# Altium PCB ESC_v0.PcbDoc (part 2 of 2)
Units mm, origin at the board's own origin, x right, y up, seen from the top; angles counter-clockwise.
Board outline 41.25 x 47.75 mm, 4 copper layers (Top Layer, Mid Layer 1, Mid Layer 2, Bottom Layer), stack 1.65 mm thick; 224 components, 141 nets, 1063 pads, 210 vias.
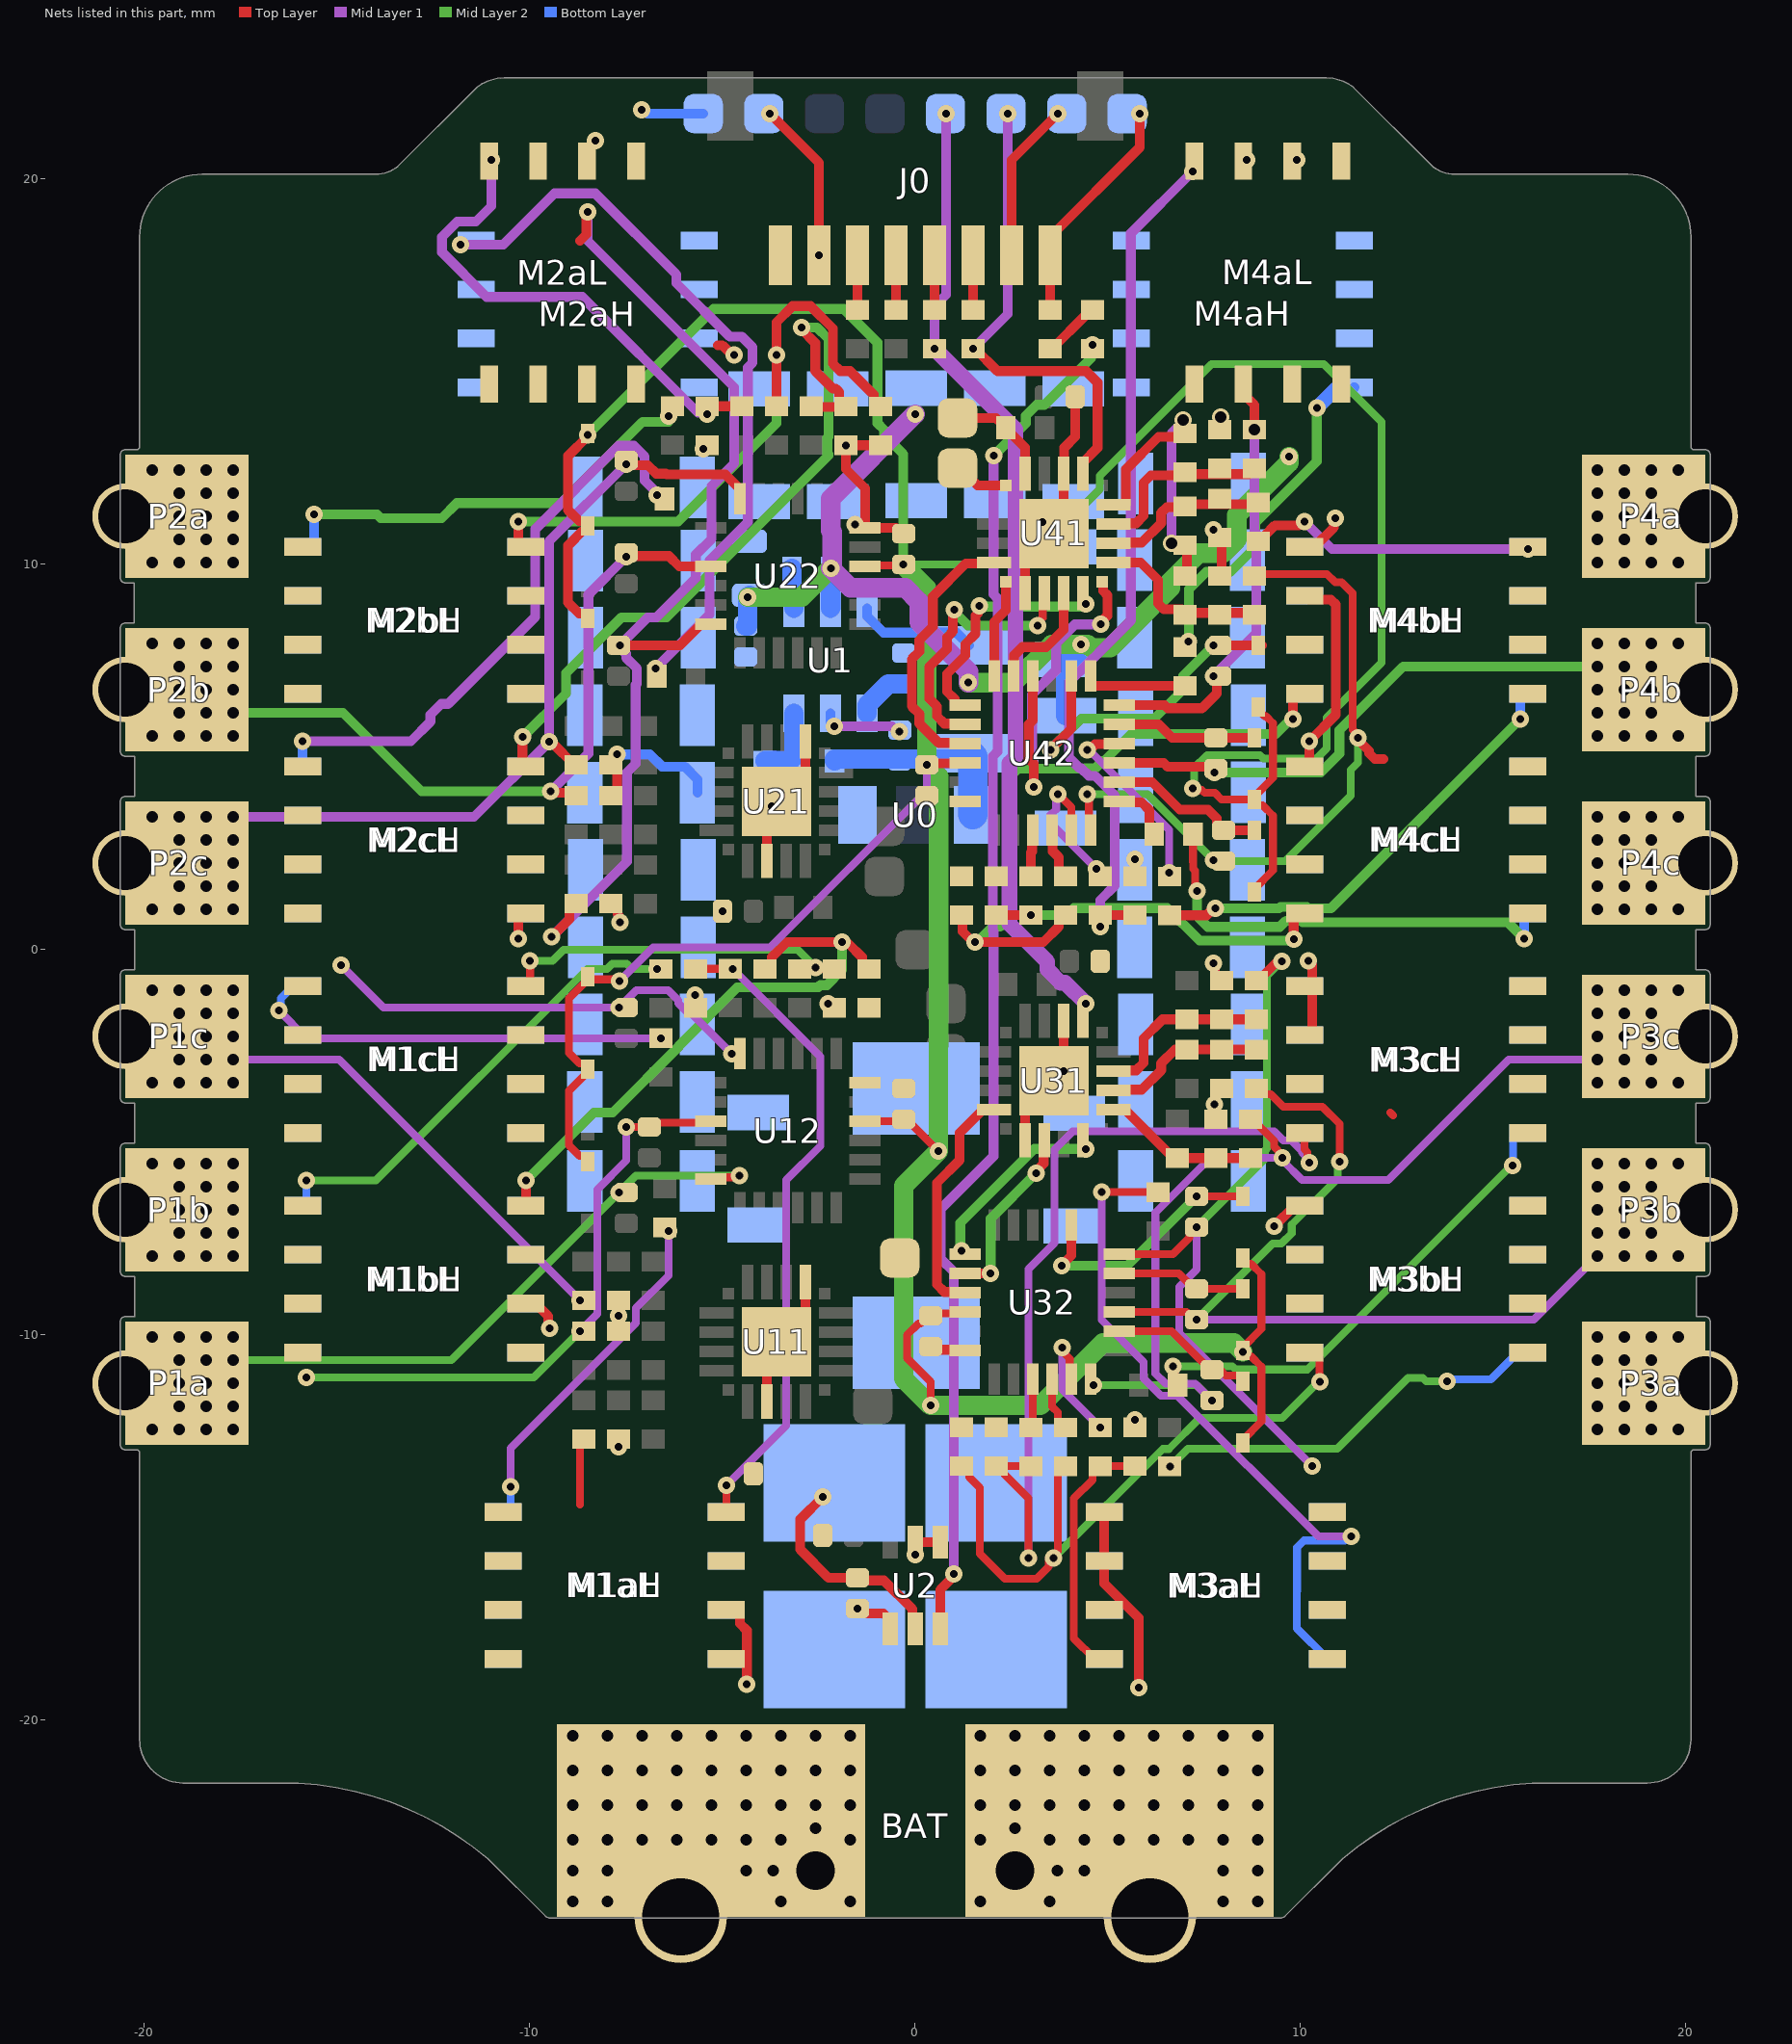
[diagram p4: the nets of this part, all layers, seen from the top]

## Via types
v1: diameter 0.45, hole 0.2, Top Layer to Bottom Layer, 202 vias
v2: diameter 0.45, hole 0.3, Top Layer to Bottom Layer, 4 vias
v3: diameter 4.572, hole 3.975, Top Layer to Bottom Layer, 4 vias

## Nets (pads, with @x,y where several pads share a name; then routed paths per layer and width w, separated by ;. In a path a pad name is that pad's centre, name@x,y a point inside that pad or via, vN(x,y) a via of type N, cw(c..) or ccw(c..) an arc to the next point about the centre after c; other vN are vias at no path point) (continued)
ch3_in: CH3.P$1 R3.P$1 U31.2 | length 25.6
  Top Layer w0.254: U31.2@4.35,-1.85 4.375,-1.825 4.375,-1.506 4.431,-1.451 v1(4.431,-1.398)
  Mid Layer 1 w0.254: v1(0.5,15.6) 0.5,16.7 0.8,17 v1(0.8,21.7) ; 3.445,-0.498 3.445,-0.488 ; 3.802,-0.855 3.812,-0.855
  Mid Layer 1 w0.406: v1(0.5,15.6) 2.6,13.5 2.6,4.996 2.445,4.841 2.445,0.67 3.429,-0.314 3.429,-0.514 3.77,-0.855 3.888,-0.855 v1(4.431,-1.398)
ch3_lin1: U31.15 U32.1 | length 5.1
  Top Layer w0.254: U31.15@4.35,-4.95 4.35,-5.089 v1(4.431,-5.17)
  Mid Layer 2 w0.254: v1(1.206,-7.819) 1.171,-7.785 1.171,-7.086 3.088,-5.17 v1(4.431,-5.17)
ch3_lin2: U31.13 U32.2 | length 4.7
  Top Layer w0.254: U32.2@1.3,-8.4 v1(1.956,-8.4) ; v1(3.133,-5.802) 3.133,-5.749 3.333,-5.549 3.333,-4.967 U31.13@3.35,-4.95
  Mid Layer 2 w0.254: v1(1.956,-8.4) 1.956,-6.979 v1(3.133,-5.802)
ch3_lin3: U31.10 U32.3 | length 6.1
  Top Layer w0.254: U32.3@1.3,-8.9 1.283,-8.883 0.757,-8.883 0.563,-8.689 0.563,-6.05 1.155,-5.458 1.155,-4.753 1.733,-4.175 2.025,-4.175 U31.10@2.05,-4.15
ch3_lo1: R64.P$1 U32.11 | length 3.4
  Top Layer w0.203: v1(3.813,-10.33) 3.86,-10.377 3.86,-10.47 4.007,-10.617 4.007,-11.107 U32.11@4.05,-11.15
  Mid Layer 1 w0.203: v1(3.813,-10.33) 3.813,-11.413 v1(4.8,-12.4)
ch3_lo2: R66.P$1 U32.10 | length 1.4
  Top Layer w0.203: U32.10@3.55,-11.15 3.55,-11.861 3.697,-12.008 3.697,-12.248 3.849,-12.4 R66.P$1@3.9,-12.4
ch3_lo3: R68.P$1 U32.9 | length 1.3
  Top Layer w0.203: R68.P$1@3,-12.4 3.05,-12.35 U32.9@3.05,-11.15
ch3_mux1: R70.P$2 R71.P$2 R72.P$2 U31.19 | length 4.6
  Top Layer w0.254: U31.19@5.15,-3.15 5.167,-3.133 5.731,-3.133 5.925,-2.939 5.925,-2.3 6.417,-1.808 R71.P$2@7.05,-1.808 R72.P$2@7.95,-1.808 R70.P$2@8.85,-1.808
ch3_mux2: R73.P$2 R74.P$2 R75.P$2 U31.18 | length 4.2
  Top Layer w0.254: U31.18@5.15,-3.65 5.167,-3.633 5.878,-3.633 6.382,-3.129 6.382,-2.949 6.739,-2.592 R74.P$2@7.05,-2.592 R75.P$2@7.95,-2.592 R73.P$2@8.85,-2.592
ch3_mux3: R76.P$2 R77.P$2 R78.P$2 U31.17 | length 4.2
  Top Layer w0.254: U31.17@5.15,-4.15 5.442,-4.15 6.7,-5.408 7.05,-5.408 7.95,-5.408 R76.P$2@8.85,-5.408
ch3_vb1: C33.P$1 D33.K U32.20 | length 6.6
  Top Layer w0.203: v1(7.3,-6.4) D33.K@8.5,-6.4
  Top Layer w0.254: v1(3.8,-8.2) 3.8,-8.187 4.05,-7.937 U32.20@4.05,-7.15
  Mid Layer 2 w0.254: v1(3.8,-8.2) 5.5,-8.2 v1(7.3,-6.4)
ch3_vb2: C34.P$1 D34.K U32.17 | length 3.4
  Top Layer w0.203: U32.17@5.3,-8.4 6.835,-8.4 7.235,-8.8 D34.K@8.5,-8.8
ch3_vb3: C35.P$1 D35.K U32.14 | length 3.6
  Top Layer w0.203: U32.14@5.3,-9.9 6.649,-9.9 7.649,-10.9 C35.P$1@7.7,-10.9 ; C35.P$1@7.91,-10.9 8.057,-11.047 8.424,-11.047 8.5,-11.124 D35.K@8.5,-11.2
ch4_c2ck: CK4.P$1 R80.P$1 U41.5 | length 2.8
  Top Layer w0.254: CK4.P$1@1.1,13.8 2.1,13.8 2.172,13.728 2.223,13.728 2.35,13.601 R80.P$1@2.35,13.55 2.35,13.499 2.477,13.372 2.51,13.372 2.85,13.032 U41.5@2.85,12.35
ch4_c2d: CD4.P$1 U41.6 | length 1.4
  Top Layer w0.254: CD4.P$1@1.1,12.5 1.169,12.5 1.619,12.05 U41.6@2.35,12.05
ch4_com_all: R91.P$1 R94.P$1 R97.P$1 U41.20 | length 7.5
  Top Layer w0.254: U41.20@5.15,11.55 5.442,11.55 5.467,11.575 5.467,12.467 6.313,13.313 6.813,13.313 R91.P$1@6.85,13.35 ; v2(6.95,13.75) 6.975,13.725 6.975,13.425 R91.P$1@7,13.4 ; R97.P$1@7.05,9.75 R94.P$1@7.05,10.55
  Mid Layer 1 w0.254: v2(6.648,10.552) 6.648,13.395 6.95,13.697 v2(6.95,13.75)
ch4_hin1: U41.16 U42.22 | length 9.6
  Top Layer w0.254: U42.22@3.05,7.1 3.05,5.951 2.945,5.845 2.945,4.954 3.072,4.827 3.072,4.227 v1(3.078,4.221) ; v1(4.814,8.443) 4.814,8.496 4.986,8.667 4.986,9.201 4.875,9.312 4.875,9.525 U41.16@4.85,9.55
  Mid Layer 1 w0.254: v1(3.078,4.221) 3.078,4.917 3.041,4.954 3.041,4.98 3.032,4.989 3.032,6.626 3.658,7.252 3.658,7.959 4.142,8.443 v1(4.814,8.443)
ch4_hin2: U41.14 U42.23 | length 3.1
  Top Layer w0.254: U42.23@2.55,7.1 2.567,7.117 2.567,7.643 2.781,7.857 3.402,7.857 3.85,8.305 U41.14@3.85,9.25 U41.14@3.833,9.233
ch4_hin3: U41.11 U42.24 | length 2.6
  Top Layer w0.254: U42.24@2.05,7.1 2.05,8.512 2.35,8.812 U41.11@2.35,9.55
ch4_ho1: R81.P$1 U42.19 | length 2.7
  Top Layer w0.254: U42.19@4.55,7.1 4.55,6.875 4.575,6.85 R81.P$1@7,6.85
ch4_ho2: R82.P$1 U42.16 | length 5.1
  Top Layer w0.203: v1(6.585,2) 6.585,1.915 R82.P$1@6.6,1.9
  Top Layer w0.254: v1(4.469,5.188) 4.522,5.188 4.667,5.333 5.283,5.333 U42.16@5.3,5.35
  Mid Layer 1 w0.203: v1(4.469,5.188) 4.508,5.188 6.585,3.11 v1(6.585,2)
ch4_ho3: R83.P$1 U42.13 | length 1.5
  Top Layer w0.254: U42.13@5.3,3.85 5.325,3.825 5.875,3.825 6.073,3.627 6.073,3.127 R83.P$1@6.2,3
ch4_in: CH4.P$1 R4.P$1 U41.2 | length 12.6
  Top Layer w0.254: v1(1.5,15.6) 1.551,15.6 2.135,15.016 4.436,15.016 4.734,14.717 4.734,13.026 4.35,12.642 U41.2@4.35,12.35
  Mid Layer 1 w0.254: v1(1.5,15.6) 2.4,16.5 v1(2.4,21.7)
ch4_lin1: U41.15 U42.1 | length 6.4
  Top Layer w0.254: U42.1@1.3,6.35 1.046,6.35 1.021,6.375 1.021,6.504 0.824,6.701 0.824,7.161 1.3,7.636 1.3,7.937 1.566,8.203 1.566,8.675 1.622,8.73 1.622,8.886 v1(1.657,8.921) ; U41.15@4.35,9.25 4.35,9.052 v1(4.431,8.971)
  Mid Layer 2 w0.254: v1(1.657,8.921) 1.672,8.906 4.313,8.906 4.378,8.971 v1(4.431,8.971)
ch4_lin2: U41.13 U42.2 | length 7.2
  Top Layer w0.203: v1(3.172,8.412) 3.172,8.479 3.307,8.614 3.307,9.207 U41.13@3.35,9.25
  Top Layer w0.254: v1(1.011,8.828) 0.973,8.791 0.973,8.257 0.824,8.108 0.824,7.807 0.367,7.35 0.367,6.511 0.563,6.315 0.563,6.061 0.757,5.867 1.283,5.867 U42.2@1.3,5.85
  Mid Layer 2 w0.254: v1(1.011,8.828) 1.011,8.775 1.365,8.421 1.365,8.412 v1(3.172,8.412)
ch4_lin3: U41.10 U42.3 | length 7
  Top Layer w0.254: U42.3@1.3,5.35 1.283,5.367 0.61,5.367 0.106,5.871 0.106,6.126 -0.09,6.322 -0.09,7.539 0.106,7.736 0.106,8.037 0.456,8.386 0.456,9.169 1.311,10.025 2.025,10.025 U41.10@2.05,10.05
ch4_lo1: R84.P$1 U42.11 | length 3.8
  Top Layer w0.203: v1(3.704,4.035) 3.717,4.035 4.05,3.703 U42.11@4.05,3.1 ; v1(4.7,2.1) 4.7,2.008 R84.P$1@4.8,1.908
  Mid Layer 1 w0.203: v1(3.704,4.035) 3.657,3.988 3.657,3.643 3.509,3.495 3.509,3.291 v1(4.7,2.1)
ch4_lo2: R86.P$1 U42.10 | length 1.4
  Top Layer w0.254: U42.10@3.55,3.1 3.567,3.083 3.567,2.557 3.722,2.402 3.722,2.035 3.849,1.908 R86.P$1@3.9,1.908
ch4_lo3: R88.P$1 U42.9 | length 1.2
  Top Layer w0.254: R88.P$1@3,1.908 3,2.524 3.033,2.557 3.033,3.083 U42.9@3.05,3.1
ch4_mux1: R90.P$2 R91.P$2 R92.P$2 U41.19 | length 4.5
  Top Layer w0.254: U41.19@5.15,11.05 5.167,11.067 5.731,11.067 5.925,11.261 5.925,11.671 5.925,12.125 6.113,12.313 6.821,12.313 6.85,12.342 7.75,12.342 R90.P$2@8.65,12.342
ch4_mux2: R93.P$2 R94.P$2 R95.P$2 U41.18 | length 4.3
  Top Layer w0.254: U41.18@5.15,10.55 5.167,10.567 5.878,10.567 6.382,11.071 6.382,11.339 6.531,11.488 6.98,11.488 7.05,11.558 7.95,11.558 R93.P$2@8.85,11.558
ch4_mux3: R96.P$2 R97.P$2 R98.P$2 U41.17 | length 4.6
  Top Layer w0.254: U41.17@5.15,10.05 5.85,10.05 6.3,9.6 6.3,8.984 6.449,8.835 6.906,8.835 6.999,8.742 7.95,8.742 R96.P$2@8.85,8.742
ch4_vb1: C43.P$1 D43.K U42.20 | length 9
  Top Layer w0.254: v1(3.511,5.188) 3.511,5.199 4.05,5.738 U42.20@4.05,7.1 ; v1(7.738,7.9) 8.389,7.9 D43.K@9,7.9
  Mid Layer 2 w0.254: v1(3.511,5.188) 3.511,5.199 4.312,6 6.2,6 6.95,6.75 6.95,7.113 v1(7.738,7.9)
ch4_vb2: C44.P$1 D44.K U42.17 | length 3.6
  Top Layer w0.254: U42.17@5.3,5.85 6.322,5.85 6.672,5.5 D44.K@8.8,5.5
ch4_vb3: C45.P$1 D45.K U42.14 | length 4.1
  Top Layer w0.254: U42.14@5.3,4.35 6.15,4.35 6.865,3.635 7.599,3.635 7.822,3.412 7.822,3.227 7.949,3.1 C45.P$1@8,3.1 D45.K@8.8,3.1
curr_sens: CURR.P$1 J0.1 R04.P$2 | length 6.1
  Top Layer w0.254: R04.P$2@3.5,16.608 J0.1@3.5,18.025 3.5,18.5 5.828,20.828 v1(5.828,21.7)
GND: BAT.P$2 C01.P$2 C1.P$2 C02.P$2 C2.P$2 C03.P$2 C3.P$2 C4.P$2 C04.P$2 C5.P$2 C6.P$2 C7.P$2 C8.P$1 C9.P$1 C10.P$1 C11.P$2 C12.P$2 C16.P$2 C17.P$2 C18.P$2 C19.P$2 C21.P$2 C22.P$2 C26.P$1 C27.P$1 C28.P$1 C29.P$1 C30.P$1 C31.P$2 C32.P$2 C36.P$1 C37.P$1 C38.P$1 C39.P$1 C40.P$1 C41.P$2 C42.P$2 C46.P$1 C47.P$1 C48.P$2 C50.P$1 C60.P$1 D00.C gnd.P$1 GNDd.P$1 J0.8 M1aL.1 M1aL.2 M1aL.3 M1bL.1 M1bL.2 M1bL.3 M1cL.1 M1cL.2 M1cL.3 M2aL.1 M2aL.2 M2aL.3 M2bL.1 M2bL.2 M2bL.3 M2cL.1 M2cL.2 M2cL.3 M3aL.1 M3aL.2 M3aL.3 M3bL.1 M3bL.2 M3bL.3 M3cL.1 M3cL.2 M3cL.3 M4aL.1 M4aL.2 M4aL.3 M4bL.1 M4bL.2 M4bL.3 M4cL.1 M4cL.2 M4cL.3 R01.P$1 R25.P$2 R27.P$2 R29.P$2 R32.P$1 R35.P$1 R38.P$1 R45.P$2 R47.P$2 R49.P$2 R52.P$1 R55.P$1 R58.P$1 R65.P$2 R67.P$2 R69.P$2 R72.P$1 R75.P$1 R78.P$1 R85.P$2 R87.P$2 R89.P$2 R92.P$1 R95.P$1 R98.P$1 U0.1 U1.2 U2.1 U2.2 U11.3 U11.12 U11.21 U12.6 U21.3 U21.12 U21.21 U22.6 U31.3 U31.12 U31.21 U32.6 U41.3 U41.12 U41.21 U42.6 | length 57.3
  Top Layer w0.254: v1@-10.4,0.3 -10.312,0.3 v1(-10.3,0.288) -10.3,0.843 -10.199,0.945 M2cL.1@-10.104,0.945 ; M1bL.2@-10.104,-9.185 -9.85,-9.185 -9.524,-9.511 -9.524,-9.782 v1(-9.487,-9.82) ; M2aL.2@-8.515,20.471 -8.515,20.725 -8.338,20.902 -8.338,20.962 v1(-8.3,21) ; R52.P$1@-7.9,1.2 -7.849,1.2 -7.722,1.073 -7.722,0.922 -7.702,0.902 -7.702,0.743 v1(-7.665,0.706) ; R55.P$1@-7.9,4 -7.86,4 -7.733,4.127 v1(-7.733,5.07) -7.77,5.032 -7.77,4.927 -7.897,4.8 R58.P$1@-7.9,4.8 ; v1(-7.7,-12.9) R32.P$1@-7.7,-12.7 ; R35.P$1@-7.7,-9.9 v1(-7.7,-9.5) R38.P$1@-7.7,-9.1 ; v1(-5.712,-1.182) -5.706,-1.188 -5.706,-1.502 R25.P$2@-5.7,-1.508 ; v1(-5.5,13) -5.492,13 R45.P$2@-5.4,13.092 ; -5.119,15.69 -5.007,15.69 -4.753,15.435 v1(-4.7,15.435) ; M1aL.2@-4.904,-17.135 -4.65,-17.135 -4.549,-17.237 -4.549,-17.491 -4.368,-17.671 v1(-4.368,-19.058) ; U11.3@-3.85,-11.726 -3.85,-10.426 U11.21@-3.6,-10.176 -2.85,-9.426 U11.12@-2.85,-8.626 ; U21.3@-3.85,2.3 -3.85,3.6 v1(-3.725,3.725) U21.21@-3.6,3.85 -2.85,4.6 U21.12@-2.85,5.4 ; v1(-2.267,-1.4) -2.208,-1.4 R29.P$2@-2.1,-1.508 ; v1(-1.56,11.031) -1.479,10.95 U22.6@-1.3,10.95 ; R47.P$2@-0.9,13.092 v1(-1.8,13.092) -1.8,12.476 -1.3,11.976 U22.6@-1.3,10.95 ; C22.P$2@-0.3,10.8 -0.351,10.8 -0.501,10.95 U22.6@-1.3,10.95 ; v1(0,-15.705) U2.2@0,-15.375 U2.1@0.65,-15.375 ; C32.P$2@0.4,-10.3 0.483,-10.383 1.283,-10.383 U32.6@1.3,-10.4 ; U31.12@2.85,-4.95 2.85,-4.15 U31.21@3.6,-3.4 v1(3.85,-3.15) U31.3@3.85,-1.85 ; U41.12@2.85,9.25 2.85,10.05 U41.21@3.6,10.8 ; v1(3.3,11.1) U41.21@3.6,10.8 ; C41.P$2@4.15,14.35 4.15,13.316 3.867,13.034 3.867,12.367 U41.3@3.85,12.35 3.85,11.05 U41.21@3.6,10.8 ; M3aL.1@4.904,-14.595 M3aL.2@4.904,-15.865 4.904,-16.449 5.8,-17.345 v1(5.8,-19.151) ; R65.P$2@5.7,-12.392 v1(5.7,-12.2) ; R85.P$2@5.7,1.908 v1(5.7,2.345) ; v1(7.738,-0.354) 7.775,-0.392 7.775,-0.673 7.902,-0.8 R72.P$1@7.95,-0.8 ; v1(7.738,10.9) 7.738,10.862 R95.P$1@7.9,10.7 ; R92.P$1@7.9,13.5 7.925,13.525 v2(7.925,13.825) ; R78.P$1@7.95,-4.4 7.925,-4.4 7.798,-4.273 7.798,-4.047 v1(7.761,-4.01) 7.798,-3.972 7.798,-3.727 7.925,-3.6 R75.P$1@7.95,-3.6 ; R98.P$1@7.95,9.75 R95.P$1@7.95,10.55 ; M4aL.3@8.515,20.471 8.571,20.471 v1(8.6,20.5) ; v1(9.315,-7.172) 9.323,-7.172 9.85,-6.645 M3bL.1@10.104,-6.645 ; M4aL.2@9.785,20.471 9.871,20.471 v1(9.9,20.5) ; M3cL.2@10.104,-2.215 10.199,-2.215 10.3,-2.113 10.3,-0.4 10.2,-0.3 v1(10.2,-0.288) ; M4cL.1@10.104,4.755 10.124,4.755 10.225,4.857 v1(10.225,5.412) 10.917,6.104 10.917,8.954 10.788,9.083 10.206,9.083 M4bL.2@10.104,9.185 ; M4bL.1@10.104,10.455 10.358,10.455 10.862,10.959 10.862,11.163 v1(10.9,11.201)
  Mid Layer 1 w0.254: v1(-2.1,5.8) -0.602,5.8 -0.459,5.657 v1(-0.406,5.657)
  Bottom Layer w0.254: v1(-7.733,5.07) -6.884,5.07 -6.567,4.752 -5.98,4.752 -5.65,4.421 C10.P$1@-5.65,4.079 ; v1(-7.1,21.8) -7.047,21.8 -6.947,21.7 GNDd.P$1@-5.5,21.7 ; U1.2@-2.2,6.135 -2.2,5.9 v1(-2.1,5.8)
  other v1: -5,1
M1a: C13.P$2 M1aH.1 M1aH.2 M1aH.3 M1aL.5 M1aL.6 M1aL.7 M1aL.8 P1a.P$1 R30.P$1 U12.18 | length 17.8
  Top Layer w0.203: -8.7,-14.4 -8.7,-12.8 R30.P$1@-8.6,-12.7 ; v1(-7.688,-6.3) C13.P$2@-7.5,-6.3 ; U12.18@-5.3,-5.95 -5.258,-5.908 -4.598,-5.908 v1(-4.556,-5.865)
  Mid Layer 2 w0.203: P1a.P$1@-17.7,-10.65 -12.038,-10.65 v1(-7.688,-6.3) -7.253,-5.865 v1(-4.556,-5.865)
M1a_HG: M1aH.4 R21.P$2 | length 9.3
  Top Layer w0.203: R21.P$2@-6.5,-7.208 -6.408,-7.3 v1(-6.4,-7.3)
  Mid Layer 1 w0.203: v1(-10.5,-13.938) -10.5,-12.941 -7.246,-9.688 -7.246,-9.305 -6.4,-8.459 v1(-6.4,-7.3)
  Bottom Layer w0.203: M1aH.4@-10.696,-14.595 -10.627,-14.595 -10.5,-14.468 v1(-10.5,-13.938)
M1a_LG: M1aL.4 R24.P$2 R25.P$1 | length 17
  Top Layer w0.203: R25.P$1@-5.7,-0.5 -5.696,-0.496 -4.804,-0.496 R24.P$2@-4.8,-0.492 -4.792,-0.5 -4.788,-0.496 v1(-4.741,-0.496) ; M1aL.4@-4.904,-14.595 -4.9,-14.591 v1(-4.9,-13.9)
  Mid Layer 1 w0.203: v1(-4.9,-13.9) -3.346,-12.346 -3.346,-5.977 -2.463,-5.094 -2.463,-2.774 v1(-4.741,-0.496)
M1b: C14.P$2 M1bH.1 M1bH.2 M1bH.3 M1bL.5 M1bL.6 M1bL.7 M1bL.8 P1b.P$1 R33.P$1 U12.15 | length 15.7
  Top Layer w0.203: v1(-7.5,-4.6) C14.P$2@-6.9,-4.6 -6.793,-4.493 -5.343,-4.493 U12.15@-5.3,-4.45
  Mid Layer 1 w0.203: v1(-8.7,-9.9) -8.246,-9.446 -8.246,-7.76 -8.254,-7.752 -8.254,-6.224 -7.5,-5.471 v1(-7.5,-4.6)
  Mid Layer 2 w0.203: v1(-15.8,-11.104) -9.904,-11.104 v1(-8.7,-9.9)
M1b_HG: M1bH.4 R22.P$2 | length 12.3
  Top Layer w0.203: v1(-6.7,-0.5) R22.P$2@-6.6,-0.5
  Mid Layer 2 w0.203: v1(-15.8,-5.988) -13.994,-5.988 -8.506,-0.5 -7.996,-0.5 -7.86,-0.364 -7.485,-0.364 -7.349,-0.5 v1(-6.7,-0.5)
  Bottom Layer w0.203: M1bH.4@-15.896,-6.645 -15.8,-6.549 v1(-15.8,-5.988)
M1b_LG: M1bL.4 R26.P$2 R27.P$1 | length 15.3
  Top Layer w0.254: M1bL.4@-10.104,-6.645 -10.1,-6.641 v1(-10.1,-5.988) ; R26.P$2@-3.9,-0.5 -3.849,-0.5 -3.722,-0.373 -3.722,-0.196 -3.326,0.2 v1(-1.9,0.2) -1.862,0.162 -1.737,0.162 -1.378,-0.196 -1.378,-0.373 -1.251,-0.5 R27.P$1@-1.2,-0.5
  Mid Layer 2 w0.254: v1(-10.1,-5.988) -8.336,-4.225 -7.847,-4.225 -6.121,-2.498 -6.121,-2.479 -4.617,-0.975 -2.519,-0.975 -2.465,-0.921 -2.294,-0.921 -1.9,-0.527 v1(-1.9,0.2)
M1c: C15.P$2 M1cH.1 M1cH.2 M1cH.3 M1cL.5 M1cL.6 M1cL.7 M1cL.8 P1c.P$1 R36.P$1 U12.12 | length 23.6
  Top Layer w0.203: v1(-8.7,-9.1) R36.P$1@-8.6,-9.1 ; v1(-7.688,-1.5) C15.P$2@-7.5,-1.5 ; v1(-4.762,-2.697) -4.553,-2.697 U12.12@-4.55,-2.7
  Mid Layer 1 w0.203: P1c.P$1@-17.7,-2.85 -14.95,-2.85 v1(-8.7,-9.1) ; v1(-14.9,-0.4) -13.8,-1.5 v1(-7.688,-1.5) -7.234,-1.046 -6.412,-1.046 -6.146,-1.312 -6.146,-1.389 -5.9,-1.636 -5.823,-1.636 v1(-4.762,-2.697)
M1c_HG: M1cH.4 R23.P$2 | length 11.3
  Top Layer w0.203: v1(-6.6,-2.3) R23.P$2@-6.6,-2.292
  Mid Layer 1 w0.203: v1(-16.513,-1.58) -15.793,-2.3 v1(-6.6,-2.3)
  Bottom Layer w0.203: v1(-16.513,-1.58) -16.466,-1.533 -16.466,-1.261 -16.15,-0.945 M1cH.4@-15.896,-0.945
M1c_LG: M1cL.4 R28.P$2 R29.P$1 | length 9.3
  Top Layer w0.203: M1cL.4@-10.104,-0.945 -9.993,-0.834 v1(-9.993,-0.288) ; R28.P$2@-3,-0.5 -2.979,-0.479 -2.612,-0.479 v1(-2.591,-0.459) ; v1@-2.55,-0.5 R29.P$1@-2.1,-0.5
  Mid Layer 2 w0.203: v1(-9.993,-0.288) -9.413,-0.288 -9.125,0 -3.05,0 v1(-2.591,-0.459)
M2a: C23.P$2 M2aH.1 M2aH.2 M2aH.3 M2aL.5 M2aL.6 M2aL.7 M2aL.8 P2a.P$1 R50.P$1 U22.18 | length 27.4
  Top Layer w0.254: v1(-9.435,0.331) -8.978,0.788 -8.978,1.073 -8.851,1.2 R50.P$1@-8.8,1.2 ; -8.7,18.4 -8.538,18.562 -8.538,19.113 v1(-8.5,19.151) ; v1(-7.665,7.9) -6.104,7.9 -5.554,8.45 U22.18@-5.3,8.45
  Mid Layer 1 w0.254: v1(-9.435,0.331) -7.479,2.287 -7.479,4.598 -7.254,4.824 -7.254,6.869 -7.221,6.902 -7.221,7.298 -7.502,7.579 -7.502,7.684 -7.665,7.847 v1(-7.665,7.9) -6.942,8.622 -6.718,8.622 -5.693,9.647 -5.693,10.254 -5.287,10.659 -5.287,12.033 -4.7,12.62 -4.7,14.6 -8.5,18.4 v1(-8.5,19.151)
M2a_HG: M2aH.4 R41.P$2 | length 19.5
  Top Layer w0.254: v1(-6.742,7.3) -6.742,7.134 R41.P$2@-6.708,7.1
  Mid Layer 1 w0.254: v1(-11.801,18.3) -10.689,18.3 -9.36,19.63 -8.302,19.63 -6.2,17.528 -6.2,17.3 -4.814,15.914 -4.502,15.914 -4.221,15.634 -4.221,15.237 -4.344,15.114 -4.344,11.099 -5.337,10.106 -5.337,8.705 v1(-6.742,7.3)
M2a_LG: M2aL.4 R44.P$2 R45.P$1 | length 12.7
  Top Layer w0.254: R45.P$1@-5.396,14.104 -4.504,14.104 R44.P$2@-4.5,14.108
  Mid Layer 1 w0.254: v1(-11,20.5) -11,19.3 -11.401,18.899 -11.879,18.899 -12.28,18.498 -12.28,18.102 -11.123,16.944 -8.644,16.944 -5.638,13.938 -5.438,13.938 v1(-5.4,13.9)
M2b: C24.P$2 M2bH.1 M2bH.2 M2bH.3 M2bL.5 M2bL.6 M2bL.7 M2bL.8 P2b.P$1 R53.P$1 U22.15 | length 18.9
  Top Layer w0.254: v1(-9.459,4.109) -9.421,4.072 -8.872,4.072 R53.P$1@-8.8,4 ; C24.P$2@-7.416,10.216 -6.391,10.216 -6.125,9.95 U22.15@-5.3,9.95
  Mid Layer 1 w0.254: v1(-9.459,4.109) -8.479,5.089 -8.479,9.221 v1(-7.5,10.2)
  Mid Layer 2 w0.254: P2b.P$1@-17.7,6.15 -14.85,6.15 -12.809,4.109 v1(-9.459,4.109)
M2b_HG: M2bH.4 R42.P$2 | length 11.7
  Top Layer w0.254: v1(-6.4,13.849) -6.362,13.887 -6.362,14.046 R42.P$2@-6.3,14.108
  Mid Layer 2 w0.254: v1(-15.6,11.3) -13.967,11.3 -13.867,11.2 -12.286,11.2 -11.895,11.591 -9.187,11.591 -7.077,13.7 v1@-6.4,13.7
  Bottom Layer w0.254: M2bH.4@-15.896,10.455 -15.802,10.455 -15.7,10.557 -15.6,10.557 v1(-15.6,11.3)
M2b_LG: M2bL.4 R46.P$2 R47.P$1 | length 17.1
  Top Layer w0.254: v1(-10.3,11.112) -10.3,10.557 -10.199,10.455 M2bL.4@-10.104,10.455 ; R46.P$2@-3.6,14.108 v1(-3.6,15.435) ; v1@-3.509,15.435 -3.6,15.526 -3.6,16.285 -3.179,16.706 -2.719,16.706 -2.135,16.123 -2.135,15.209 -1.942,15.016 -1.69,15.016 -1.078,14.404 -1.078,14.227 -0.951,14.1 R47.P$1@-0.9,14.1
  Mid Layer 2 w0.254: v1(-10.3,11.112) -6.153,11.112 -3.6,13.665 v1(-3.6,15.435)
M2c: C25.P$2 M2cH.1 M2cH.2 M2cH.3 M2cL.5 M2cL.6 M2cL.7 M2cL.8 P2c.P$1 R56.P$1 U22.12 | length 21.3
  Top Layer w0.254: v1(-9.502,5.395) -9.465,5.357 -9.408,5.357 -8.851,4.8 R56.P$1@-8.8,4.8 ; C25.P$2@-7.373,12.573 -6.938,12.573 -6.72,12.355 -6.47,12.355 -6.45,12.335 -4.931,12.335 -4.55,11.954 U22.12@-4.55,11.7
  Mid Layer 1 w0.254: P2c.P$1@-17.7,3.45 -11.447,3.45 v1(-9.502,5.395) -9.502,10.598 v1(-7.5,12.6)
M2c_HG: M2cH.4 R43.P$2 | length 15.6
  Top Layer w0.254: v1(-6.7,11.8) -6.608,11.8 R43.P$2@-6.508,11.7
  Mid Layer 1 w0.254: v1(-15.9,5.412) -13.088,5.412 -12.579,5.921 -12.579,6.098 -12.298,6.378 -12.122,6.378 -9.858,8.642 -9.858,10.92 -7.698,13.079 -7.302,13.079 -7.021,12.798 -7.021,12.174 -6.7,11.853 v1(-6.7,11.8)
  Bottom Layer w0.254: v1(-15.9,5.412) -15.9,4.759 M2cH.4@-15.896,4.755
M2c_LG: M2cL.4 R48.P$2 R49.P$1 | length 19.5
  Top Layer w0.254: v1(-10.192,5.52) -10.192,4.843 M2cL.4@-10.104,4.755 ; v1(-2.949,16.151) -2.949,16.098 -2.592,15.742 -2.592,15.02 -2.131,14.559 -2.059,14.559 -1.978,14.478 -1.978,14.227 -1.851,14.1 R49.P$1@-1.8,14.1 -1.814,14.086 -2.678,14.086 R48.P$2@-2.7,14.108
  Mid Layer 2 w0.254: v1(-10.192,5.52) -9.063,6.649 -9.063,7.179 -7.616,8.626 -6.451,8.626 -2.25,12.827 -2.25,12.865 -2.279,12.894 -2.279,13.29 -2.25,13.319 -2.25,15.85 -2.551,16.151 v1(-2.949,16.151)
M3a: C33.P$2 M3aH.1 M3aH.2 M3aH.3 M3aL.5 M3aL.6 M3aL.7 M3aL.8 P3a.P$1 R70.P$1 U32.18 | length 18.9
  Top Layer w0.203: U32.18@5.3,-7.9 6.69,-7.9 7.112,-7.477 7.112,-7.35 7.263,-7.2 v1(7.3,-7.2)
  Top Layer w0.254: R70.P$1@8.85,-0.8 8.901,-0.8 9.363,-0.338 9.471,-0.338 v1(9.508,-0.3)
  Mid Layer 1 w0.203: v1(7.3,-7.2) 7.3,-8.301 6.846,-8.754 6.846,-9.946 v1(10.3,-13.4)
  Mid Layer 2 w0.203: v1(7.3,-7.2) 9.078,-5.422 9.078,-5.214 9.129,-5.163 9.129,-0.679 v1(9.508,-0.3)
M3a_HG: M3aH.4 R61.P$2 | length 18.6
  Top Layer w0.203: v1(4.838,-6.288) 4.842,-6.292 R61.P$2@6.3,-6.292
  Mid Layer 1 w0.203: v1(4.838,-6.288) 4.838,-9.607 5.928,-10.697 5.928,-11.128 6.372,-11.572 6.803,-11.572 10.461,-15.23 v1(11.313,-15.23)
  Bottom Layer w0.203: M3aH.4@10.696,-18.405 9.9,-17.609 9.9,-16.643 9.908,-16.635 9.908,-15.51 10.087,-15.332 11.145,-15.332 11.246,-15.23 v1(11.313,-15.23)
M3a_LG: M3aL.4 R64.P$2 R65.P$1 | length 6.7
  Top Layer w0.203: M3aL.4@4.904,-18.405 4.65,-18.405 4.117,-17.872 4.117,-14.24 4.597,-13.76 4.597,-13.56 4.749,-13.408 R64.P$2@4.8,-13.408 4.804,-13.404 5.696,-13.404 R65.P$1@5.7,-13.4
M3b: C34.P$2 M3bH.1 M3bH.2 M3bH.3 M3bL.5 M3bL.6 M3bL.7 M3bL.8 P3b.P$1 R73.P$1 U32.15 | length 22.5
  Top Layer w0.203: U32.15@5.3,-9.4 7.035,-9.4 7.235,-9.6 v1(7.3,-9.6) ; R73.P$1@8.85,-3.6 9.002,-3.752 9.23,-3.752 9.553,-4.076 10.568,-4.076 11.012,-4.52 v1(11.012,-5.501)
  Mid Layer 1 w0.203: v1(7.3,-9.6) 16.05,-9.6 P3b.P$1@17.7,-7.95
  Mid Layer 2 w0.203: v1(7.3,-9.6) 9.274,-7.626 9.503,-7.626 9.769,-7.36 9.769,-7.131 10.965,-5.935 10.965,-5.548 v1(11.012,-5.501)
M3b_HG: M3bH.4 R62.P$2 | length 10.6
  Top Layer w0.203: R62.P$2@6.6,-13.408 6.608,-13.408 v1(6.611,-13.411)
  Mid Layer 2 w0.203: v1(6.611,-13.411) 7.075,-12.946 10.954,-12.946 12.788,-11.112 13.169,-11.112 13.257,-11.201 v1(13.8,-11.201)
  Bottom Layer w0.203: v1(13.8,-11.201) 13.847,-11.153 14.943,-11.153 15.642,-10.455 M3bH.4@15.896,-10.455
M3b_LG: M3bL.4 R66.P$2 R67.P$1 | length 17.3
  Top Layer w0.203: R67.P$1@1.2,-13.4 1.251,-13.4 1.403,-13.552 1.403,-13.693 1.677,-13.967 1.677,-15.677 2.323,-16.323 3.153,-16.323 3.464,-16.013 v1@3.464,-15.793 ; v1(3.587,-15.793) 3.587,-15.726 3.697,-15.617 3.697,-13.56 3.849,-13.408 R66.P$2@3.9,-13.408 ; M3bL.4@10.104,-10.455 10.358,-10.455 10.485,-10.582 10.485,-11.205 v1(10.497,-11.216)
  Mid Layer 2 w0.203: v1(3.587,-15.793) 6.423,-12.957 6.583,-12.957 7.387,-12.154 9.525,-12.154 10.463,-11.216 v1(10.497,-11.216)
M3c: C35.P$2 M3cH.1 M3cH.2 M3cH.3 M3cL.5 M3cL.6 M3cL.7 M3cL.8 P3c.P$1 R76.P$1 U32.12 | length 24.5
  Top Layer w0.203: U32.12@4.55,-11.15 4.631,-11.231 v1(4.631,-11.303) ; R76.P$1@8.7,-4.4 8.751,-4.4 9.31,-4.959 9.31,-5.113 9.532,-5.335 v1(9.532,-5.402) ; 12.322,-4.222 12.4,-4.3
  Mid Layer 1 w0.203: v1(7.7,-11.7) 7.267,-11.267 6.498,-11.267 6.233,-11.002 6.233,-6.826 7.656,-5.402 v1(9.532,-5.402) 9.532,-5.469 10.039,-5.976 12.273,-5.976 15.399,-2.85 P3c.P$1@17.7,-2.85
  Mid Layer 2 w0.203: v1(4.631,-11.303) 7.303,-11.303 v1(7.7,-11.7)
M3c_HG: M3cH.4 R63.P$2 | length 12.7
  Top Layer w0.203: v1(6.686,-10.814) 6.733,-10.861 6.733,-11.225 R63.P$2@6.808,-11.3
  Mid Layer 2 w0.203: v1(6.686,-10.814) 8.229,-10.814 8.311,-10.895 10.175,-10.895 15.471,-5.6 v1(15.5,-5.6)
  Bottom Layer w0.203: v1(15.5,-5.6) 15.515,-5.585 15.515,-4.882 15.642,-4.755 M3cH.4@15.896,-4.755
M3c_LG: M3cL.4 R68.P$2 R69.P$1 | length 22.7
  Top Layer w0.203: R69.P$1@2.1,-13.4 2.151,-13.4 R69.P$1@2.155,-13.404 ; R68.P$2@3,-13.408 2.996,-13.404 R69.P$1@2.155,-13.404 ; v1@3.057,-15.8 2.941,-15.8 v1(2.934,-15.793) 2.934,-14.234 2.303,-13.603 2.303,-13.552 R69.P$1@2.155,-13.404 ; M3cL.4@10.104,-4.755 10.1,-4.759 10.1,-5.178 10.179,-5.257 10.179,-5.475 v1(10.227,-5.522)
  Mid Layer 1 w0.203: v1(2.934,-15.793) 2.934,-8.292 3.612,-7.614 3.612,-5.188 4.084,-4.716 9.316,-4.716 9.549,-4.949 9.763,-4.949 10.037,-5.222 10.037,-5.265 10.227,-5.455 v1(10.227,-5.522)
M4a: C43.P$2 M4aH.1 M4aH.2 M4aH.3 M4aL.5 M4aL.6 M4aL.7 M4aL.8 P4a.P$1 R90.P$1 U42.18 | length 11.5
  Top Layer w0.254: U42.18@5.3,6.35 6.468,6.35 6.553,6.266 7.442,6.266 7.822,6.646 C43.P$2@7.822,6.973 ; v1(7.733,7.1) C43.P$2@8,7.1 ; M4aL.6@8.515,14.679 8.515,14.425 8.8,14.14 v2(8.8,13.5)
  Mid Layer 1 w0.254: v1(7.733,7.1) 8.85,8.217 8.85,10.807 8.8,10.857 v2(8.8,13.5)
M4a_HG: M4aH.4 R81.P$2 | length 8.8
  Top Layer w0.254: R81.P$2@7,7.858 7,7.909 v1(7.092,8.001)
  Mid Layer 2 w0.254: v1(7.092,8.001) 7.1,8.009 7.1,9.355 7.557,9.811 8.189,9.811 8.826,10.449 8.826,11.081 10.42,12.675 v1(10.42,14.062)
  Bottom Layer w0.254: M4aH.4@11.294,14.493 M4aH.4@11.396,14.595 M4aH.4@11.391,14.6
  Bottom Layer w0.381: v1(10.42,14.062) 10.9,14.542
M4a_LG: M4aL.4 R84.P$2 R85.P$1 | length 22.9
  Top Layer w0.254: v1(4.8,0.6) R84.P$2@4.8,0.9 R85.P$1@5.7,0.9
  Mid Layer 1 w0.254: v1(4.8,0.6) 4.8,1.286 5.179,1.665 5.179,4 4.665,4.514 4.504,4.514 4.309,4.709 4.27,4.709 3.99,4.989 3.99,6.941 4.493,7.444 4.498,7.444 4.779,7.725 4.779,7.73 5.596,8.547 5.596,18.596 v1(7.2,20.2)
M4b: C44.P$2 M4bH.1 M4bH.2 M4bH.3 M4bL.5 M4bL.6 M4bL.7 M4bL.8 P4b.P$1 R93.P$1 U42.15 | length 21.6
  Top Layer w0.254: U42.15@5.3,4.85 6.45,4.85 6.555,4.745 7.622,4.745 7.761,4.607 v1(7.761,4.6) 7.8,4.639 C44.P$2@7.8,4.7 ; R93.P$1@8.9,10.6 8.951,10.6 9.078,10.727 9.078,10.757 9.334,11.014 9.949,11.014 10.047,11.112 v1(10.1,11.112)
  Mid Layer 1 w0.254: v1(10.1,11.112) 10.812,10.4 v1(15.9,10.4)
  Mid Layer 2 w0.254: v1(7.761,4.6) 10.522,4.6 11.009,5.087 11.009,5.699 12.66,7.35 P4b.P$1@17.7,7.35
M4b_HG: M4bH.4 R82.P$2 | length 12
  Top Layer w0.254: R82.P$2@6.6,0.892 7.558,0.892 7.736,1.07 v1(7.789,1.07)
  Mid Layer 2 w0.254: v1(7.789,1.07) 9.437,1.07 9.475,1.108 10.166,1.108 10.204,1.07 10.782,1.07 v1(15.7,5.988)
  Bottom Layer w0.254: v1(15.7,5.988) 15.7,6.543 15.802,6.645 M4bH.4@15.896,6.645
M4b_LG: M4bL.4 R86.P$2 R87.P$1 | length 17.3
  Top Layer w0.254: R87.P$1@1.2,0.9 1.224,0.876 1.224,0.476 1.5,0.2 1.8,0.2 3.326,0.2 3.722,0.596 3.722,0.773 3.849,0.9 R86.P$2@3.9,0.9 ; v1(9.801,5.988) 9.801,6.543 9.903,6.645 M4bL.4@10.104,6.645
  Mid Layer 2 w0.254: v1(1.554,0.2) 1.607,0.2 2.002,0.595 2.195,0.595 2.521,0.921 2.521,4.551 2.67,4.7 4.4,4.7 4.409,4.709 4.667,4.709 4.858,4.9 4.9,4.9 5.6,5.6 9.36,5.6 9.748,5.988 v1(9.801,5.988)
M4c: C45.P$2 M4cH.1 M4cH.2 M4cH.3 M4cL.5 M4cL.6 M4cL.7 M4cL.8 P4c.P$1 R96.P$1 U42.12 | length 18.5
  Top Layer w0.203: v1(4.467,4.035) 4.508,3.994 4.508,3.142 U42.12@4.55,3.1 ; v1(7.738,2.324) 7.762,2.3 C45.P$2@8,2.3 ; R96.P$1@8.85,9.75 10.682,9.75 10.897,9.535 11.068,9.535 11.349,9.254 11.349,7.281 11.349,5.707 11.488,5.567 v1(11.488,5.501)
  Top Layer w0.254: v1(11.488,5.501) 11.488,5.448 11.776,5.16 11.776,5.099 11.925,4.95 12.15,4.95
  Mid Layer 2 w0.203: v1(4.467,4.035) 6.026,4.035 v1(7.738,2.324) ; v1@7.738,2.3 9.6,2.3 11.3,4 11.3,4.667 11.488,4.855 v1(11.488,5.501)
M4c_HG: M4cH.4 R83.P$2 | length 11.7
  Top Layer w0.203: R83.P$2@7.208,3 7.208,2.282 7.21,2.28 7.21,2.103 7.266,2.046 7.266,1.565 v1(7.313,1.518)
  Mid Layer 2 w0.254: v1(7.313,1.518) 7.31,1.515 7.31,0.872 7.591,0.591 9.461,0.591 9.622,0.753 10.019,0.753 10.057,0.715 15.37,0.715 15.796,0.288 v1(15.8,0.288)
  Bottom Layer w0.254: v1(15.8,0.288) 15.8,0.849 M4cH.4@15.896,0.945
M4c_LG: M4cL.4 R88.P$2 R89.P$1 | length 9.1
  Top Layer w0.254: R89.P$1@2.1,0.9 v1(3,0.9) ; v1(9.821,0.274) 9.821,0.843 9.8,0.843 9.902,0.945 M4cL.4@10.104,0.945
  Mid Layer 2 w0.254: v1(3,0.9) 3.936,0.9 4.115,1.079 6.536,1.079 7.379,0.236 v1@9.608,0.236 ; v1@9.609,0.236 9.783,0.236 v1(9.821,0.274)
NC: J0.2 NC.P$1 | length 4.2
  Top Layer w0.254: J0.2@2.5,18.025 2.5,20.5 v1(3.7,21.7)
NetC00_P$1: C00.P$1 L00.1 U1.6 | length 3.2
  Bottom Layer w0.254: U1.6@-1.25,8.865 -1.25,8.656 -0.824,8.229 1.071,8.229 L00.1@1.4,7.9
NetC00_P$2: C00.P$2 U1.1 | length 1.4
  Bottom Layer w0.508: U1.1@-1.25,6.135 -1.25,6.344 -0.694,6.9 C00.P$2@-0.3,6.9
NetJ0_3: J0.3 R4.P$2 | length 1.4
  Top Layer w0.254: R4.P$2@1.5,16.608 J0.3@1.5,18.025
NetJ0_4: J0.4 R3.P$2 | length 1.4
  Top Layer w0.254: R3.P$2@0.5,16.608 J0.4@0.5,18.025
NetJ0_5: J0.5 R2.P$2 | length 1.4
  Top Layer w0.254: R2.P$2@-0.5,16.608 J0.5@-0.5,18.025
NetJ0_6: J0.6 R1.P$2 | length 1.4
  Top Layer w0.254: R1.P$2@-1.5,16.608 J0.6@-1.5,18.025
NetR0_P$1: R0.P$1 U1.4 | length 1.1
  Bottom Layer w0.508: R0.P$1@-3.2,9.9 -3.2,9.125 -3.15,9.075 U1.4@-3.15,8.865
NetR01_P$2: R01.P$2 R02.P$1 U1.3 | length 1.9
  Bottom Layer w0.508: R01.P$2@-3.9,4.908 -3.243,4.908 -3.15,5.001 U1.3@-3.15,6.135
NetR03_P$1: R03.P$1 U2.6 | length 35.5
  Top Layer w0.254: U2.6@0.65,-17.625 0.65,-16.61 1,-16.26 v1(1,-16.207)
  Mid Layer 1 w0.254: v1(1,-16.207) 1,-8.357 0.661,-8.018 0.661,-6.733 2.033,-5.361 2.033,0.471 2.013,0.491 2.013,5.02 2.136,5.143 2.136,9.12 2.033,9.223 v1(2.033,12.822)
  Mid Layer 2 w0.254: v1(2.033,12.822) 2.871,13.66 2.871,13.863 3.152,14.144 3.355,14.144 4.562,15.351 4.562,15.662 v1(4.6,15.7)
NetR03_P$2: R03.P$2 R04.P$1 | length 1.5
  Top Layer w0.254: R04.P$1@3.5,15.6 3.551,15.6 4.422,16.471 4.422,16.481 4.549,16.608 R03.P$2@4.6,16.608
PVDD: C03.P$1 C12.P$1 C22.P$1 C32.P$1 C42.P$1 D13.A D14.A D15.A D23.A D24.A D25.A D33.A D34.A D35.A D43.A D44.A D45.A L00.2 R02.P$2 U0.3 U12.4 U22.4 U32.4 U42.4 | length 125.1
  Top Layer w0.203: D13.A@-8.5,-5.5 -8.5,-5.424 -8.576,-5.348 -8.715,-5.348 -8.983,-5.08 -8.983,-3.659 -8.5,-3.176 D14.A@-8.5,-3.1 -8.5,-3.024 -8.576,-2.947 -8.715,-2.947 -8.983,-2.68 -8.983,-1.259 D15.A@-8.5,-0.776 ; D15.A@-8.5,-0.7 -8.429,-0.771 -7.72,-0.771 v1(-7.673,-0.818) ; U12.4@-1.3,-4.45 -0.178,-4.45 v1(0.6,-5.228) ; U22.4@-1.3,9.95 -1.275,9.975 -0.325,9.975 C22.P$1@-0.308,9.992 ; v1(-0.313,9.996) C22.P$1@-0.308,9.992 ; C22.P$1@-0.3,10 C22.P$1@-0.308,9.992 ; v1(0.4,-11.828) 0.4,-11.215 -0.21,-10.606 -0.21,-9.994 0.085,-9.7 0.135,-9.7 0.335,-9.5 C32.P$1@0.4,-9.5 0.457,-9.443 1.257,-9.443 U32.4@1.3,-9.4 ; v1(7.2,4.19) 7.247,4.143 7.442,4.143 7.514,4.07 7.774,4.07 7.945,3.9 D44.A@8.8,3.9 ; D35.A@8.5,-12.8 8.5,-12.724 8.983,-12.241 8.983,-10.82 8.715,-10.553 ; v1(8.5,-10.438) D34.A@8.5,-10.4 8.5,-10.324 8.983,-9.841 8.983,-8.42 8.715,-8.153 8.576,-8.153 8.5,-8.076 D33.A@8.5,-8 ; D45.A@8.8,1.5 8.8,1.576 9.283,2.059 9.283,3.48 9.015,3.748 8.876,3.748 8.8,3.824 D44.A@8.8,3.9 ; D43.A@8.9,6.3 8.9,6.224 9.065,6.059 9.104,6.059 9.283,5.88 9.283,4.459 8.8,3.976 D44.A@8.8,3.9
  Top Layer w0.254: D23.A@-8.5,8.6 -8.5,8.676 -8.551,8.727 -8.726,8.727 -9.008,9.009 -9.008,10.492 -8.627,10.873 -8.551,10.873 -8.5,10.924 -8.5,11.076 -8.551,11.127 -8.726,11.127 -9.008,11.409 -9.008,12.816 -8.5,13.324 v1(-8.5,13.362) D25.A@-8.5,13.4 ; v1(0.3,4.8) 0.333,4.833 1.283,4.833 U42.4@1.3,4.85
  Mid Layer 1 w0.203: v1(-7.673,-0.818) -6.796,0.059 -3.767,0.059 0.3,4.126 v1(0.3,4.8)
  Mid Layer 2 w0.203: v1(-0.313,9.996) 2.838,9.996 4.79,11.949 4.79,12.299 7.691,15.2 10.6,15.2 12.1,13.7 12.1,7.447 10.679,6.026 10.679,5.224 10.413,4.958 9.041,4.958 8.945,5.054 7.573,5.054 7.239,4.72 7.239,4.23 v1(7.2,4.19)
  Mid Layer 2 w0.254: v1(-8.5,13.362) -5.232,16.63 -1.853,16.63 -0.979,15.756 -0.979,13.667 -0.813,13.501 -0.813,13.366 -0.313,12.865 v1(-0.313,9.996)
  Mid Layer 2 w0.508: v1(-0.313,9.996) 0.3,9.384 v1(0.3,4.8) 0.606,4.494 0.606,-2.486 0.6,-2.492 v1(0.6,-5.228) -0.3,-6.128 -0.3,-11.128 v1(0.4,-11.828) 3.249,-11.828 4.869,-10.208 8.27,-10.208 v1(8.5,-10.438)
  Bottom Layer w0.508: R02.P$2@-2.092,4.9 -2.092,4.951 1.251,4.951 L00.2@1.4,5.1
  Bottom Layer w0.762: L00.2@1.4,5.1 1.5,5 U0.3@1.5,3.5
PWR: C1.P$1 C01.P$1 C02.P$1 C2.P$1 C3.P$1 C4.P$1 C5.P$1 C05.P$2 C6.P$1 C7.P$1 C8.P$2 C9.P$2 C10.P$2 C16.P$1 C17.P$1 C18.P$1 C19.P$1 C26.P$2 C27.P$2 C28.P$2 C29.P$2 C30.P$2 C36.P$2 C37.P$2 C38.P$2 C39.P$2 C40.P$2 C46.P$2 C47.P$2 C48.P$1 C50.P$2 C60.P$2 D00.A J0.7 M1aH.5 M1aH.6 M1aH.7 M1aH.8 M1bH.5 M1bH.6 M1bH.7 M1bH.8 M1cH.5 M1cH.6 M1cH.7 M1cH.8 M2aH.5 M2aH.6 M2aH.7 M2aH.8 M2bH.5 M2bH.6 M2bH.7 M2bH.8 M2cH.5 M2cH.6 M2cH.7 M2cH.8 M3aH.5 M3aH.6 M3aH.7 M3aH.8 M3bH.5 M3bH.6 M3bH.7 M3bH.8 M3cH.5 M3cH.6 M3cH.7 M3cH.8 M4aH.5 M4aH.6 M4aH.7 M4aH.8 M4bH.5 M4bH.6 M4bH.7 M4bH.8 M4cH.5 M4cH.6 M4cH.7 M4cH.8 R000.P$1 R00.P$1 R0.P$2 U1.5 U2.5 VCC.P$1 | length 38
  Top Layer w0.254: v1(-3.772,21.7) -2.5,20.428 v1(-2.5,18.025) ; v1(-2.4,-14.2) -2.984,-14.784 -2.984,-15.567 -2.251,-16.3 C05.P$2@-1.5,-16.3 -1.431,-16.369 -0.814,-16.369 -0.073,-17.11 -0.073,-17.552 U2.5@0,-17.625
  Mid Layer 1 w0.508: v1(0,13.9) -2.192,11.708 -2.192,10.878 -2.157,10.843 -2.157,9.935 v1(-2.192,9.9) -1.682,9.39 -0.255,9.39 0.1,9.035 0.1,8.5 1.379,7.221 v1(1.379,6.931)
  Mid Layer 2 w0.508: v1(-4.35,9.15) -2.942,9.15 v1(-2.192,9.9) ; v1(1.379,6.931) 2.547,6.931 3.54,7.923 v1(4.3,7.923) 4.477,7.923 4.563,7.837 5.065,7.837 6.617,9.389 6.617,9.555 7.357,10.294 7.989,10.294 8.344,10.649 8.344,11.281 9.7,12.637 v1(9.7,12.8)
  Bottom Layer w0.508: C01.P$1@-4.4,8.4 -4.35,8.4 v1(-4.35,9.15) C02.P$1@-4.3,9.2 ; U1.5@-2.2,8.865 -2.192,8.873 v1(-2.192,9.9) ; C30.P$2@3.9,6.073 C47.P$2@3.9,7.527 4.097,7.527 4.3,7.73 v1(4.3,7.923)
VBAT: BAT.P$1 C05.P$1 R000.P$2 R00.P$2 U2.4 | length 1.2
  Top Layer w0.254: v1(-1.5,-17.1) -1.373,-17.227 -0.823,-17.227 -0.65,-17.4 U2.4@-0.65,-17.625
pads on no net: J0.P1 J0.P2 U11.1 U11.7 U11.8 U11.9 U12.5 U12.7 U12.8 U12.21 U21.1 U21.7 U21.8 U21.9 U22.5 U22.7 U22.8 U22.21 U31.1 U31.7 U31.8 U31.9 U32.5 U32.7 U32.8 U32.21 U41.1 U41.7 U41.8 U41.9 U42.5 U42.7 U42.8 U42.21
copper on no net:
  other v3: -15.25,-15.25 15.25,-15.25 -15.25,15.25 15.25,15.25

## Polygon pours and split planes (outlines as drawn)
PWR on Bottom Layer "PWR_L04_P020" (solid, pour order 20): -9.821,18.723 9.821,18.723 9.821,15.272 14.321,10.773 14.321,-13.523 9.043,-18.8 4.523,-18.8 4.523,-15.5 -4.4,-15.5 -4.4,-18.9 -4.478,-18.978 -9,-18.978 -9,-17.3 -14.321,-11.979 -14.321,10.773
PWR on Bottom Layer "PWR_L04_P045" (solid, pour order 45): 4.7,5.6 4.7,9.6 3,9.6 1.9,10.7 -4.8,10.7 -4.8,7.3 -1.6,7.3 -1.5,7.4 -1.5,9.3 -1,9.3 -1,8.4 2.6,8.4 2.6,5.6
NetC00_P$1 on Bottom Layer "NETC00_P$1_L04_P043" (solid, pour order 43): 2.6,8.4 -1,8.4 -1,9.3 -1.5,9.3 -1.5,7.4 2.6,7.4
GND on Bottom Layer "GND_L04_P019" (solid, pour order 19): -6.525,11.804 6.475,11.804 6.475,-7.196 -6.525,-7.196
GND on Bottom Layer "GND_L04_P023" (solid, pour order 23): 1.347,-25.127 4.523,-21.952 4.523,-18.8 20.4,-18.8 20.4,-23.027 14.473,-25.127 8.194,-25.127
VBAT on Bottom Layer "VBAT_L04_P022" (solid, pour order 22): -4.3,-15.7 4.4,-15.7 4.4,-21.721 0.921,-25.2 -20.8,-25.2 -20.8,-19.2 -20.7,-19.1
M4a on Bottom Layer "M4A_L04_P018" (solid, pour order 18): 9.6,18.8 20.5,18.8 20.7,18.6 20.627,18.527 20.627,9.65 13.99,9.65 9.933,14.3 9.6,14.3
M3a on Bottom Layer "M3A_L04_P016" (solid, pour order 16): 17.4,-9.7 20.577,-9.7 20.6,-9.677 20.6,-19 9.1,-19 9.1,-12.5 12.2,-11.4 17.4,-9.8 17.5,-9.8
M3b on Bottom Layer "M3B_L04_P015" (solid, pour order 15): 14.3,-4.6 20.7,-4.5 20.7,-9 20.2,-9.5 17.4,-9.5 16.3,-10.6 14.4,-10.6
M3c on Bottom Layer "M3C_L04_P014" (solid, pour order 14): 14.5,0 20.7,0 20.7,-4.5 14.5,-4.5
M4c on Bottom Layer "M4C_L04_P013" (solid, pour order 13): 14.5,0 20.7,0 20.7,5.052 20.627,5.125 20.603,5.1 14.5,5.1
M4b on Bottom Layer "M4B_L04_P012" (solid, pour order 12): 14.321,10.8 18.9,10.8 20.7,9 20.627,8.927 20.627,5.15 16.95,5.15 14.321,6.328
GND on Bottom Layer "GND_L04_P011" (solid, pour order 11): -20.3,19 20.5,19 20.5,22.591 -19.4,22.591
M2a on Bottom Layer "M2A_L04_P010" (solid, pour order 10): -20.384,9.624 -13.876,9.624 -9.59,13.91 -9.5,18.7 -20.4,18.7
M2b on Bottom Layer "M2B_L04_P009" (solid, pour order 9): -14.1,9.6 -20.481,9.6 -20.549,9.532 -20.526,9.509 -20.526,5.15 -17.35,5.15 -17.2,5 -14.1,5.023
M2c on Bottom Layer "M2C_L04_P008" (solid, pour order 8): -20.513,0.637 -20.255,-0.2 -14.1,-0.3 -14.1,5.023 -20.625,5.125 -20.5,0.624
M1b on Bottom Layer "M1B_L04_P005" (solid, pour order 5): -20.424,-5.2 -17.3,-5.2 -16.5,-6 -14.2,-6 -14.2,-10.9 -14.2,-11.8 -16.3,-11.8 -17.1,-11 -17.1,-9.4 -19.8,-9.4 -20.2,-9 -20.2,-5.424
M1c on Bottom Layer "M1C_L04_P006" (solid, pour order 6): -20.444,-0.665 -17.32,-0.665 -16.52,-1.465 -14.175,-1.465 -14.175,-5.802 -15.5,-5.802 -16.4,-5.802 -17.301,-4.901 -17.9,-4.901 -19.8,-4.901 -20.22,-4.465 -20.22,-0.889
M1a on Bottom Layer "Bottom Layer-M1a" (solid, pour order 2): -19.877,-9.75 -17.673,-9.75 -17.629,-9.795 -17.629,-10.7 ccw(c-17.4,-10.7) -17.562,-10.862 -16.462,-11.962 ccw(c-16.3,-11.8) -16.3,-12.029 -11.495,-12.029 -9,-13.6 -9,-18.978 -20.127,-18.978 -20.127,-10.1
GND on Top Layer "GND_L01_P046" (solid, pour order 46): -22.3,24.8 23.4,24.8 23.4,-28.4 21.9,-29.9 -22.5,-29.9
M1a on Top Layer "M1A_L01_P039" (solid, pour order 39): -6.479,-18.723 -20.377,-18.723 -20.7,-18.4 -20.7,-8.9 -17.3,-8.9 -16.4,-9.8 -16.4,-10.8 -11.707,-10.8 -8.229,-14.278 -6.479,-14.278
M1b on Top Layer "M1B_L01_P038" (solid, pour order 38): -11.679,-10.773 -11.707,-10.8 -16.4,-10.8 -16.4,-9.8 -17.3,-8.9 -20.7,-8.9 -20.7,-4.3 -17.5,-4.3 -16.728,-5.072 -11.679,-5.072
M2a on Top Layer "M2A_L01_P037" (solid, pour order 37): -6.927,18.896 -6.927,14.273 -7,14.2 -9.2,14.2 -10.1,13.3 -10.1,12.5 -11.7,10.9 -16.6,10.9 -16.6,9.9 -17.4,9.1 -21.1,9.1 -21.1,18.4 -20.6,18.9
M2b on Top Layer "M2B_L01_P035" (solid, pour order 35): -11.7,5.4 -16.4,5.4 -16.9,4.9 -21.2,4.9 -21.2,8.6 -20.8,9 -17.2,9 -16.4,9.8 -16.4,10.8 -11.707,10.8 -11.674,10.768 -11.674,5.548
M2c on Top Layer "M2C_L01_P033" (solid, pour order 33): -11.679,0.2 -20.7,0.2 -20.7,4.8 -16.7,4.8 -16.2,5.2 -11.679,5.2
M1c on Top Layer "M1C_L01_P032" (solid, pour order 32): -20.7,-0.2 -11.7,-0.2 -11.679,-0.221 -11.679,-5.072 -16.428,-5.072 -17.2,-4.3 -20.7,-4.3
M4a on Top Layer "M4A_L01_P031" (solid, pour order 31): 20.627,9.65 17.1,9.65 15.85,10.9 11.7,10.9 10.3,12.3 10.3,13.3 9.4,14.2 6.9,14.2 6.9,18.868 6.932,18.9 20.7,18.9
M4b on Top Layer "M4B_L01_P030" (solid, pour order 30): 20.618,5.101 16.999,5.101 16.8,5.3 11.7,5.3 11.7,10.752 11.679,10.773 11.707,10.8 16.3,10.8 16.9,10.2 16.9,9.5 17,9.4 20.7,9.4
M3a on Top Layer "M3A_L01_P029" (solid, pour order 29): 20.627,-9.65 17.35,-9.65 16.6,-10.4 16.6,-10.9 11.7,-10.9 8.323,-14.278 6.479,-14.278 6.479,-18.723 6.557,-18.8 20.7,-18.8
M3b on Top Layer "M3B_L01_P028" (solid, pour order 28): 20.7,-4.7 16.6,-4.7 16.6,-5.2 11.8,-5.2 11.679,-5.321 11.679,-10.773 16.372,-10.773 16.4,-10.8 16.4,-10.3 17.2,-9.5 17.278,-9.578 20.608,-9.578
M3c on Top Layer "M3C_L01_P026" (solid, pour order 26): 20.7,-0.302 11.802,-0.302 11.679,-0.424 11.679,-5.072 16.328,-5.072 16.4,-5 16.4,-4.5 20.7,-4.5
M4c on Top Layer "M4C_L01_P025" (solid, pour order 25): 20.6,0.09 11.7,0.09 11.7,5.052 11.679,5.072 16.728,5.072 16.9,4.9 20.7,4.9
+3V3 on Mid Layer 1 "+3V3_L02_P047" (solid, pour order 47): -23.9,24.7 25.7,24.7 25.7,-29.4 24.9,-30.2 -24.4,-30.2
GND on Mid Layer 2 "GND_L03_P048" (solid, pour order 48): -24.4,27.1 24.1,27.1 27.1,24.1 26.1,23.1 26.1,-28.9 -14.5,-28.9 -15.8,-30.2 -25.9,-20.1 -25.9,8.1

## Silkscreen, mask and mechanical layers (free items; w line width, h text height)
Top Overlay:
  text "GND" at -3.3,15.8 h0.4 r90
  text "VCC" at -2.3,15.8 h0.4 r90
  text "NC" at 2.7,15.8 h0.4 r90
  text "M1" at -1.3,14.5 h0.4 r90
  text "M2" at -0.3,14.5 h0.4 r90
  text "M3" at 0.7,14.5 h0.4 r90
  text "M4" at 1.7,14.5 h0.4 r90
  text "2" at -19.246,13.754 h1.52
  text "3" at 18.254,13.754 h1.52
  text "1" at -19.046,-15.246 h1.52
  text "4" at 18.254,-15.246 h1.52
  text "+" at -3.046,-20 h1.52
  text "-" at 2.054,-20.008 h1.52
Bottom Overlay:
  text "GND" at -5.7,19.6 h0.4 r270
  text "VCC" at -4.129,19.6 h0.4 r270
  text "M1" at -2.557,19.6 h0.4 r270
  text "M2" at -0.986,19.6 h0.4 r270
  text "M3" at 0.586,19.6 h0.4 r270
  text "M4" at 2.157,19.6 h0.4 r270
  text "NC" at 3.729,19.6 h0.4 r270
  text "CURR" at 5.3,19.6 h0.4 r270
  text "2" at -18.254,13.754 h1.52
  text "3" at 19.346,13.754 h1.52
  text "1" at -18.454,-15.246 h1.52
  text "4" at 19.346,-15.246 h1.52
  text "+" at -10.746,-21.7 h1.52
  text "-" at 9.954,-21.708 h1.52
Mechanical 1:
  lines w0.01: -20,13.4 -20,18.5 ; 20,-15 20,-13.4
  lines w0.254: -20,-15 -20,-18.5 ; -17.077,16.063 ccw(c-15.25,15.25) -16.063,17.077 ; -14.016,20 -18.5,20 ccw(c-18.5,18.5) -20,18.5 -20,13.5 -20,12.98 -20.13,12.85 -20.5,12.85 -20.5,9.65 -20.14,9.65 -20.14,8.71 -20.14,8.363 -20.127,8.35 -20.5,8.35 -20.5,5.15 -20.128,5.15 -20.127,5.15 -20.127,4.223 -20.127,3.85 -20.128,3.85 -20.5,3.85 -20.5,0.65 -20.128,0.65 -20.128,-0.278 -20.128,-0.65 ; -13.99,20 ccw(c-13.99,21.022) -13.333,20.239 ; -13.347,20.228 -11.276,22.299 ; -11.286,22.288 cw(c-10.67,21.5) -10.67,22.5 ; -10.65,22.5 8.125,22.5 ; -5.725,22.5 10.65,22.5 ; 10.67,22.5 cw(c10.67,21.5) 11.286,22.288 ; 11.276,22.299 13.347,20.228 ; 13.333,20.239 ccw(c13.99,21.022) 13.99,20 ; 14.016,20 18.5,20 cw(c18.5,18.5) 20,18.5 20,12.978 20.128,12.85 20.5,12.85 20.5,9.65 20.203,9.65 20.127,9.574 20.127,8.35 ; 16.063,-17.077 cw(c15.25,-15.25) 17.077,-16.063 ; 16.063,17.077 ccw(c15.25,15.25) 17.077,16.063 ; -20.128,-5.15 -20.5,-5.15 -20.5,-8.35 -20.127,-8.35 ; -20.128,-5.15 -20.128,-5.15 ; -20.128,-5.15 -20.128,-4.778 -20.128,-3.85 -20.5,-3.85 -20.5,-0.65 -20.128,-0.65 ; -20.128,-0.65 -20.128,-0.65 ; -20.127,-8.35 -20.127,-8.35 ; -20.127,-8.35 -20.127,-9.574 -20.203,-9.65 -20.5,-9.65 -20.5,-12.85 -20.128,-12.85 -20,-12.978 -20,-18.5 ; -20,-18.5 -20,-20.5 ccw(c-19,-20.5) -19,-21.5 -16,-21.5 cw(c-16.5,-30) -11,-23.5 -9.5,-25 9.5,-25 11,-23.5 cw(c16.5,-30) 16,-21.5 19,-21.5 ccw(c19,-20.5) 20,-20.5 20,-18.5 20,-15 20,-13.5 20,-12.98 20.13,-12.85 20.5,-12.85 20.5,-9.65 20.14,-9.65 20.14,-8.71 20.14,-8.363 20.127,-8.35 20.5,-8.35 20.5,-5.15 20.128,-5.15 20.127,-5.15 20.127,-4.223 20.127,-3.85 20.128,-3.85 20.5,-3.85 20.5,-0.65 20.128,-0.65 20.128,0.278 20.128,0.65 20.128,0.65 20.5,0.65 20.5,3.85 20.128,3.85 20.128,4.778 20.128,5.15 ; 20.127,8.35 20.127,8.35 ; 20.127,8.35 20.5,8.35 20.5,5.15 20.128,5.15 ; 20.128,5.15 20.128,5.15 ; -17.077,-16.063 cw(c-15.25,-15.25) -16.063,-17.077 ccw(c-15.25,-15.25) -17.077,-16.063